# Altium PCB slave.PcbDoc (part 8 of 8)
Units mm, origin at the board's own origin, x right, y up, seen from the top; angles counter-clockwise.
Board outline 160 x 100 mm, 6 copper layers (Top, FUSED_VBAT-, Signals1, Signals2, SUPPLY, Bottom), stack 1.67 mm thick; 597 components, 381 nets, 1695 pads, 3029 vias.
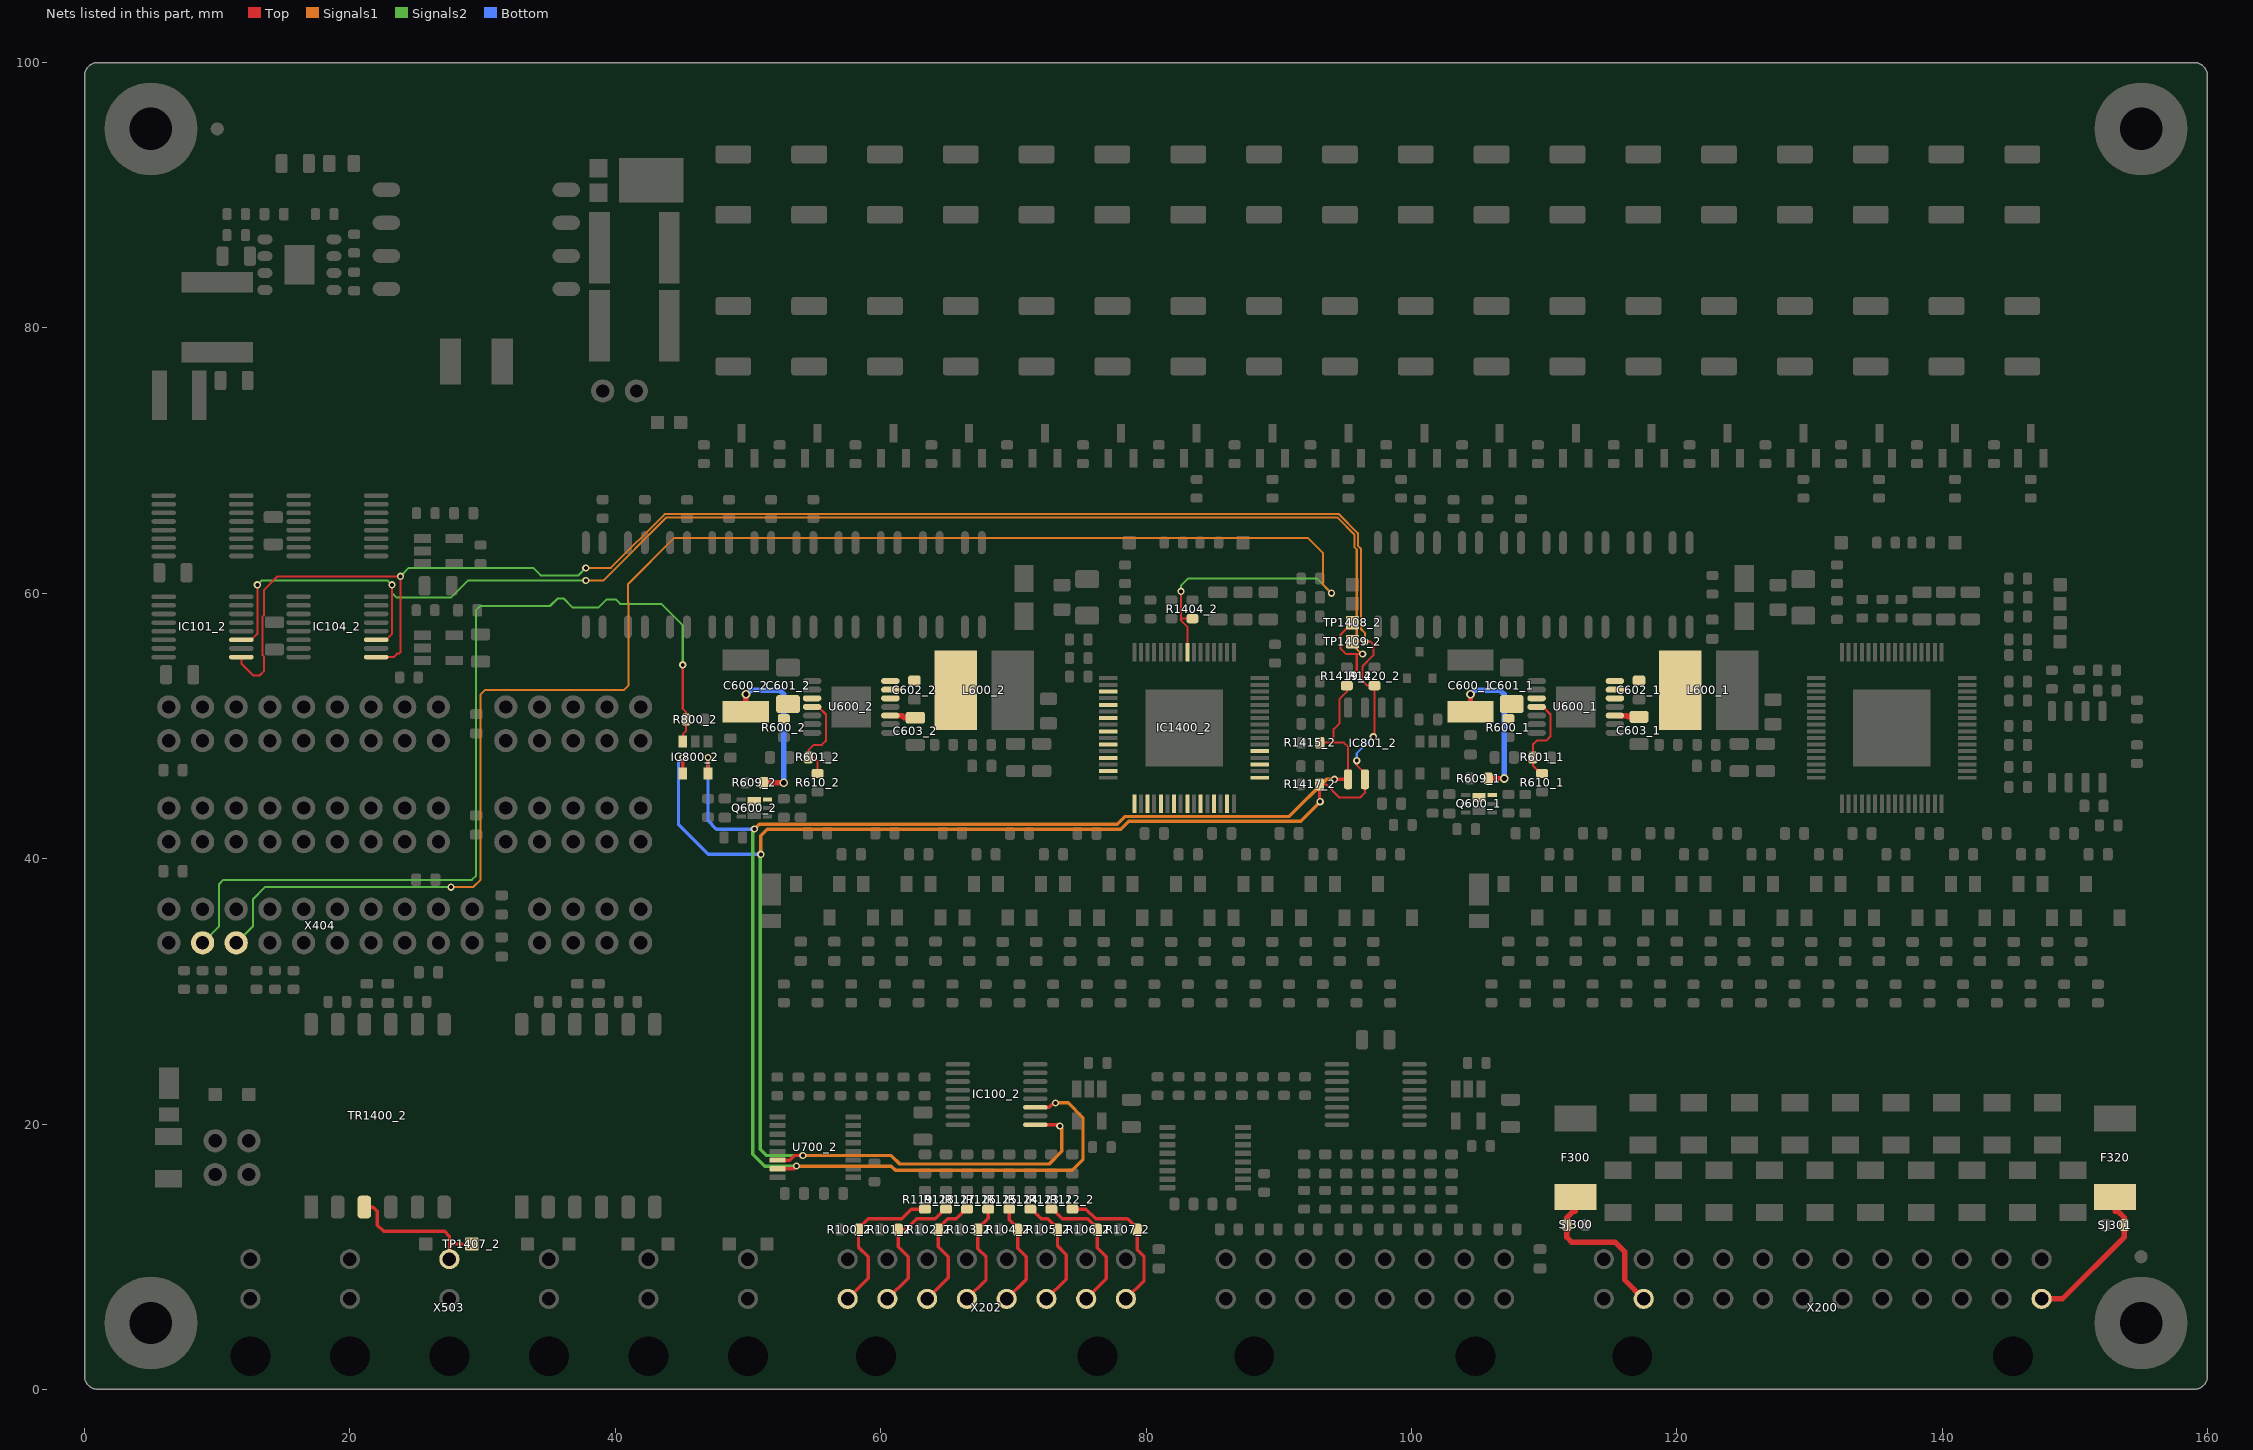
[diagram p11: the nets of this part, all layers, seen from the top]

## Via types
v1: diameter 0.55, hole 0.3, Top to Bottom, tented both sides, 2991 vias
v2: diameter 0.75, hole 0.5, Top to Bottom, tented both sides, 22 vias
v3: diameter 0.65, hole 0.4, Top to Bottom, tented both sides, 16 vias

## Nets (pads, with @x,y where several pads share a name; then routed paths per layer and width w, separated by ;. In a path a pad name is that pad's centre, name@x,y a point inside that pad or via, vN(x,y) a via of type N, cw(c..) or ccw(c..) an arc to the next point about the centre after c; other vN are vias at no path point) (continued)
SECONDARY-OUT-: TP1407_2.1 TR1400_2.3 X503.2 | length 11.4
  Top w0.254: TR1400_2.3@21.079,13.738 21.763,13.738 22.066,13.434 22.066,12.383 22.543,11.906 27.146,11.906 27.5,11.552 27.5,10.954 ; X503.2@27.5,9.815 27.5,10.954 ; TP1407_2.1@29.19,10.954 27.5,10.954
SECONDARY-S1: IC1400_2.37
SECONDARY-S2: IC1400_2.35
SECONDARY-S3: IC1400_2.33
SECONDARY-S4: IC1400_2.31
SECONDARY-S5: IC1400_2.29
SECONDARY-S6: IC1400_2.27
SECONDARY-S7: IC1400_2.25
SECONDARY-S8: IC1400_2.23
SECONDARY-S9: IC1400_2.21
SECONDARY-S10: IC1400_2.19
SECONDARY-S11: IC1400_2.17
SECONDARY-S12: IC1400_2.15
SECONDARY-S13: IC1400_2.13
SECONDARY-S14: IC1400_2.11
SECONDARY-S15: IC1400_2.9
SECONDARY-S16: IC1400_2.7
SECONDARY-S17: IC1400_2.5
SECONDARY-S18: IC1400_2.3
SECONDARY-SCL: IC100_2.1 IC101_2.1 IC104_2.1 IC800_2.4 IC801_2.6 R1417_2.1 R1420_2.1 TP1409_2.1 U700_2.14 | length 240.8
  Top w0.152: IC101_2.1@11.815,55.193 11.815,54.711 12.724,53.802 13.184,53.802 13.508,54.126 13.508,55.244 13.403,55.35 13.403,58.236 13.508,58.342 13.508,60.244 14.529,61.265 23.8,61.265 v1(23.812,61.277) 23.812,55.562 23.722,55.472 23.583,55.472 23.292,55.181 23.013,55.181 23.002,55.193 IC104_2.1@21.975,55.193 ; IC104_2.1@21.946,55.181 IC104_2.1@21.975,55.181 ; R1417_2.1@93.093,45.605 93.575,45.605 94.571,44.609 96.153,44.609 96.5,44.956 IC801_2.6@96.5,45.98 96.5,46.43 95.885,47.045 v1(95.885,47.38) ; R1417_2.1@93.129,45.548 R1417_2.1@93.143,45.561 ; TP1409_2.1@95.567,56.356 96.93,56.356 97.135,56.151 97.135,55.322 96.315,54.502 96.315,53.393 96.671,53.037 R1420_2.1@97.223,53.037 97.223,49.268 v1(97.135,49.18)
  Top w0.254: IC800_2.4@45.085,46.428 IC800_2.4@45.088,46.425 45.088,47.622 v1(45.085,47.625) ; U700_2.14@52.236,17.281 53.159,17.281 53.499,17.621 v1(54.134,17.621) ; IC100_2.1@71.664,19.95 73.395,19.95 v1(73.501,19.844) ; R1417_2.1@93.072,45.605 93.072,44.341 v1(93.122,44.291)
  Signals2 w0.152: v1(23.812,61.277) 24.447,61.912 33.823,61.912 34.378,61.358 37.228,61.358 v1(37.782,61.912)
  Signals2 w0.254: v1(50.97,40.322) 50.939,40.291 50.939,18.098 51.415,17.621 v1(54.134,17.621)
  Signals1 w0.152: v1(37.782,61.912) 39.671,61.912 43.718,65.959 94.545,65.959 95.966,64.539 95.966,63.588 96.203,63.351 96.203,57.309 96.5,57.011 v1(96.5,56.357)
  Signals1 w0.254: v1(50.97,40.322) 50.97,41.74 51.458,42.227 78.105,42.227 78.702,42.824 91.656,42.824 v1(93.122,44.291) ; v1(54.134,17.621) 60.801,17.621 61.436,16.986 72.707,16.986 73.66,17.939 73.66,19.685 v1(73.501,19.844)
  Bottom w0.152: v1(95.885,47.38) 95.885,47.942 97.122,49.18 v1(97.135,49.18)
  Bottom w0.254: v1(45.085,47.625) 44.767,47.307 44.767,42.545 46.99,40.322 v1(50.97,40.322)
SECONDARY-SDA: IC100_2.3 IC101_2.3 IC104_2.3 IC800_2.5 IC801_2.5 R1415_2.1 R1419_2.1 TP1408_2.1 U700_2.15 | length 238.5
  Top w0.152: IC101_2.3@11.786,56.502 IC101_2.3@11.815,56.502 ; IC101_2.3@11.815,56.493 12.565,56.493 13.018,56.945 v1(13.018,60.642) ; IC104_2.3@21.946,56.502 IC104_2.3@22.735,56.502 ; IC104_2.3@21.975,56.493 22.725,56.493 IC104_2.3@22.735,56.502 ; v1(23.177,60.642) 23.177,56.945 IC104_2.3@22.735,56.502 ; R1415_2.1@93.134,48.767 93.139,48.748 93.143,48.736 94.139,48.736 ; IC801_2.5@95.23,45.98 95.23,48.422 94.916,48.736 94.139,48.736 ; TP1408_2.1@95.567,57.785 94.675,56.892 94.675,55.82 95.068,55.427 95.885,55.427 ; v1(96.335,55.427) 95.885,55.427 ; 94.139,48.736 94.139,49.753 94.595,50.209 94.595,52.042 95.135,52.582 R1419_2.1@95.135,53.034 95.135,53.485 95.556,53.906 95.885,54.235 95.885,55.427
  Top w0.254: IC800_2.5@46.988,46.425 46.988,47.623 v1(46.99,47.625) ; U700_2.15@52.236,16.631 53.461,16.631 v1(53.657,16.828) ; IC100_2.3@71.664,21.25 72.69,21.25 73.03,21.59 v1(73.184,21.59) ; v1(94.212,45.98) IC801_2.5@95.23,45.98
  Signals2 w0.152: v1(13.018,60.642) 13.335,60.96 22.86,60.96 v1(23.177,60.642) 23.177,60.008 23.495,59.69 27.622,59.69 28.892,60.96 v1(37.782,60.96)
  Signals2 w0.254: v1(50.482,42.227) 50.365,42.11 50.365,17.719 51.256,16.828 v1(53.657,16.828)
  Signals1 w0.152: v1(37.782,60.96) 39.078,60.96 43.823,65.705 94.44,65.705 95.712,64.434 95.712,63.483 95.885,63.309 95.885,55.792 96.25,55.427 v1(96.335,55.427)
  Signals1 w0.254: v1(50.482,42.227) 50.838,42.583 51.458,42.583 77.826,42.583 78.422,43.18 90.805,43.18 93.605,45.98 v1(94.212,45.98) ; v1(53.657,16.828) 60.801,16.828 61.119,16.51 74.454,16.51 75.248,17.304 75.248,20.479 74.136,21.59 v1(73.184,21.59)
  Bottom w0.254: v1(46.99,47.625) 46.99,42.862 47.625,42.227 v1(50.482,42.227)
SECONDARY-T-SENSOR_0: R107_2.1 R112_2.2 X202.1 | length 11.6
  Top w0.254: R112_2.2@74.454,13.588 75.471,13.588 76.2,12.859 78.608,12.859 79.332,12.135 R107_2.1@79.332,12.035 79.332,10.521 79.851,10.001 79.851,8.179 X202.1@78.49,6.818
SECONDARY-T-SENSOR_1: R106_2.1 R113_2.2 X202.2 | length 10.3
  Top w0.254: R113_2.2@72.866,13.588 72.966,13.588 73.695,12.859 75.608,12.859 76.332,12.135 R106_2.1@76.332,12.035 76.332,10.663 76.994,10.001 76.994,8.319 X202.2@75.493,6.818
SECONDARY-T-SENSOR_2: R105_2.1 R114_2.2 X202.3 | length 8.9
  Top w0.254: R114_2.2@71.279,13.588 71.379,13.588 72.108,12.859 72.608,12.859 73.332,12.135 R105_2.1@73.332,12.035 73.332,10.806 73.977,10.16 73.977,8.299 X202.3@72.496,6.818
SECONDARY-T-SENSOR_3: R104_2.1 R115_2.2 X202.4 | length 7.9
  Top w0.254: X202.4@69.499,6.818 70.961,8.28 70.961,10.001 70.332,10.631 R104_2.1@70.332,12.035 70.332,12.135 69.691,12.775 R115_2.2@69.691,13.588
SECONDARY-T-SENSOR_4: R103_2.1 R116_2.2 X202.5 | length 7.9
  Top w0.254: X202.5@66.501,6.818 67.945,8.262 67.945,10.001 67.332,10.615 R103_2.1@67.332,12.035 67.332,12.135 68.104,12.907 R116_2.2@68.104,13.588
SECONDARY-T-SENSOR_5: R102_2.1 R117_2.2 X202.6 | length 9.1
  Top w0.254: X202.6@63.504,6.818 65.087,8.401 65.087,10.001 64.331,10.757 R102_2.1@64.331,12.035 64.331,12.135 65.055,12.859 65.687,12.859 66.416,13.588 R117_2.2@66.516,13.588
SECONDARY-T-SENSOR_6: R101_2.1 R118_2.2 X202.7 | length 10.4
  Top w0.254: X202.7@60.507,6.818 62.071,8.382 62.071,10.001 61.331,10.741 R101_2.1@61.331,12.035 61.883,12.035 62.706,12.859 64.1,12.859 64.829,13.588 R118_2.2@64.929,13.588
SECONDARY-T-SENSOR_7: R100_2.1 R119_2.2 X202.8 | length 11.9
  Top w0.254: X202.8@57.51,6.818 59.055,8.363 59.055,10.001 58.331,10.725 R100_2.1@58.331,12.035 58.331,12.135 59.055,12.859 61.595,12.859 62.324,13.588 R119_2.2@63.341,13.588
SECONDARY-TEMP-ALERT: IC800_2.3 R800_2.1 X404.18 | length 70.8
  Top w0.152: v1(45.085,54.61) 45.085,51.286 45.337,51.033 R800_2.1@45.337,50.482 45.337,49.627 45.088,49.377 IC800_2.3@45.088,48.825
  Signals2 w0.152: X404.18@8.89,33.655 10.14,34.905 10.14,38.088 10.457,38.405 29.19,38.405 29.507,38.723 29.507,58.725 29.825,59.043 35.081,59.043 35.648,59.609 36.107,59.609 36.771,58.945 38.752,58.945 39.353,59.546 40.022,59.546 40.369,59.199 43.476,59.199 45.085,57.59 v1(45.085,54.61)
SECONDARY-WDT: IC1400_2.56 R1404_2.1 X404.16 | length 130.3
  Top w0.152: v1(82.631,60.145) 82.631,58.102 ; IC1400_2.56@83.117,55.598 83.117,57.474 82.631,57.96 82.631,58.102 ; R1404_2.1@83.502,58.088 82.646,58.088 82.631,58.102
  Signals2 w0.152: X404.16@11.43,33.655 12.7,34.925 12.7,36.957 13.589,37.846 v1(27.618,37.846) ; v1(82.631,60.145) 82.631,60.565 83.185,61.119 92.869,61.119 v1(93.98,60.008)
  Signals1 w0.152: v1(27.618,37.846) 29.273,37.846 29.845,38.417 29.845,52.387 30.162,52.705 40.64,52.705 41.004,53.069 41.004,59.283 40.957,59.329 40.957,60.684 44.455,64.181 92.197,64.181 93.345,63.033 93.345,60.642 v1(93.98,60.008)
SHDN_1: R601_1.1 R610_1.1 U600_1.4 | length 7.1
  Top w0.152: U600_1.4@109.445,51.435 109.92,51.435 110.49,50.865 110.49,49.212 110.172,48.895 109.445,48.895 109.155,48.605 R601_1.1@109.155,47.625 109.155,47.02 109.755,46.42 R610_1.1@109.855,46.42
SHDN_2: R601_2.1 R610_2.1 U600_2.4 | length 7.2
  Top w0.152: U600_2.4@54.835,51.435 55.31,51.435 55.88,50.865 55.88,48.895 55.562,48.578 54.946,48.578 54.545,48.177 R601_2.1@54.545,47.625 54.997,47.625 55.245,47.377 R610_2.1@55.245,46.42
SW_1: C602_1.1 L600_1.1 U600_1.12 U600_1.13 U600_1.14
SW_2: C602_2.1 L600_2.1 U600_2.12 U600_2.13 U600_2.14
VBAT+: F300.1 SJ300.1 X200.11 | length 12.4
  Top w0.406: F300.1@112.375,14.5 112.375,13.418 112.187,13.418 111.715,12.947 SJ300.1@111.715,12.395 111.715,11.465 112.08,11.1 115.353,11.1 116.07,10.384 116.07,8.261 X200.11@117.513,6.818
VBAT-: F320.1 SJ301.2 X200.1 | length 11.6
  Top w0.406: X200.1@147.497,6.818 149.058,6.818 153.735,11.495 SJ301.2@153.735,12.383 153.735,12.934 153.238,13.431 153.035,13.431 F320.1@153.035,14.513
VCC_1: C603_1.2 U600_1.10 | length 1.9
  Top w0.406: U600_1.10@115.345,50.785 116.228,50.785 116.331,50.682 C603_1.2@117.157,50.682
VCC_2: C603_2.2 U600_2.10 | length 1.9
  Top w0.406: U600_2.10@60.735,50.785 61.618,50.785 61.784,50.619 C603_2.2@62.611,50.619
VIN_1: C600_1.2 C601_1.2 Q600_1.3 Q600_1.8 R600_1.2 R609_1.1 U600_1.3 | length 11.7
  Top w0.406: C600_1.2@104.457,51.073 v3(104.457,52.387) ; R609_1.1@105.793,46.038 v3(106.998,46.038)
  Bottom w0.406: v3(104.457,52.387) 104.775,52.705 106.68,52.705 106.998,52.387 v3(106.998,46.038)
VIN_2: C600_2.2 C601_2.2 Q600_2.3 Q600_2.8 R600_2.2 R609_2.1 U600_2.3 | length 12.6
  Top w0.406: C600_2.2@49.847,51.073 v3(49.847,52.387) ; R609_2.1@51.183,45.72 v3(52.705,45.72)
  Bottom w0.406: v3(49.847,52.387) 50.165,52.705 52.387,52.705 52.705,52.387 v3(52.705,45.72)
pads on no net: Designator5.Hole_3.2 Designator6.Hole_3.2 Designator7.Hole_3.2 Designator8.Hole_3.2 Designator11.0 Designator12.0 IC801_1.1 IC801_1.2 IC801_2.1 IC801_2.2 IC1400_1.53 IC1400_1.54 IC1400_2.53 IC1400_2.54 TR1400_1.2 TR1400_1.5 TR1400_2.2 TR1400_2.5 U700_1.13 U700_2.13 X200. X200.12 X200.23 X200.24 X201. X202. X500. X501. X502. X503. X1001. X1002.
copper on no net:
  other v1: 31.412,55.868

## Polygon pours and split planes (outlines as drawn)
+5.0V_VREG_1 on SUPPLY "Polygon_1_Net_+5.0V_VREG_1" (solid, remove dead copper, pour order 222): 5.08,32.067 17.145,32.067 52.07,32.067 52.07,13.97 55.88,13.97 55.88,0 79.375,0 79.375,31.75 100.647,31.75 100.647,63.817 48.895,63.817 48.895,34.608 5.08,34.608
+5.0V_VREG_0 on SUPPLY "Polygon_1_Net_+5.0V_VREG_0" (solid, remove dead copper, pour order 223): 17 vertices, not listed, extent 5.08,-0.185 160.384,69.27
+5.0V_VREG_1 on SUPPLY "SUPPLY-+5.0V_VREG_1" (solid, pour order 811): 5.08,59.69 32.703,59.69 32.703,53.34 44.767,53.34 44.767,45.72 5.08,45.72
NetC900_2 on Top "Polygon_1_Net_N$74" (solid, remove dead copper, pour order 779): 10.795,76.835 10.795,72.866 7.938,72.866 7.937,76.835
NetC902_2 on Top "Polygon_1_Net_N$1254" (solid, remove dead copper, pour order 761): 21 vertices, not listed, extent 4.763,72.866 23.812,93.345
EXT_DC_IN- on Top "Polygon_1_Net_EXT_DC_IN-" (solid, remove dead copper, pour order 753): 14.922,83.502 14.922,89.218 17.399,89.218 17.399,79.692 28.575,79.692 28.575,75.248 11.271,75.247 11.271,77.152 7.144,77.152 7.144,80.804 13.018,80.804 13.018,83.502
FUSED_VBAT- on Top "Polygon_2_Net_FUSED_VBAT-" (solid, pour order 759): 39.688,88.9 39.688,73.66 30.48,73.66 30.48,79.375 34.925,79.375 34.925,83.82 38.1,83.82 38.1,88.9
EXT_DC_ISO+ on Top "Polygon_1_Net_EXT_DC_ISO+" (solid, pour order 755): 45.402,93.662 45.402,73.66 40.957,73.66 40.957,89.535 40.322,89.535 40.322,93.662
+5.0V_VREG_1 on Top "Top-+5.0V_VREG_1" (solid, pour order 797): 67.945,55.88 67.945,46.355 68.897,46.355 68.897,49.53 70.802,49.53 70.802,51.435 73.66,51.435 73.66,55.88
EXT_DC_ISO+ on Top "Top-EXT_DC_ISO+ 1" (solid, pour order 821): 46.37,45.085 49.212,45.085 49.212,46.355 50.165,46.355 50.165,45.085 49.847,45.085 49.847,44.133 46.37,44.133
VIN_2 on Top "Top-VIN_2" (solid, pour order 823): 49.939,44.767 50.482,44.767 50.482,46.355 52.07,46.355 52.07,44.132 51.117,44.133 51.117,43.815 49.939,43.815
VIN_2 on Top "Top-EXT_DC_ISO+" (solid, pour order 789): 47.625,52.387 55.562,52.387 55.562,51.752 53.657,51.752 53.657,50.165 47.625,50.165
FUSED_VBAT- on Top "Top-FUSED_VBAT-" (solid, pour order 787): 18 vertices, not listed, extent 47.625,44.767 73.025,55.88
EXT_DC_ISO+ on Top "Top-EXT_DC_ISO+ 2" (solid, pour order 819): 100.98,45.402 103.822,45.402 103.822,46.672 104.775,46.672 104.775,45.402 104.457,45.402 104.457,44.45 100.98,44.45
VIN_1 on Top "Top-VIN_1" (solid, pour order 817): 104.549,45.085 105.093,45.085 105.093,46.672 106.68,46.672 106.68,44.45 105.727,44.45 105.727,44.133 104.549,44.133
VIN_1 on Top "Top-EXT_DC_ISO+" (solid, pour order 799): 102.235,52.388 110.172,52.387 110.172,51.752 108.267,51.752 108.267,50.165 102.235,50.165 102.235,51.752
FUSED_VBAT- on Top "Top-FUSED_VBAT-" (solid, pour order 807): 18 vertices, not listed, extent 102.235,44.767 127.635,55.88
NetC605_1_2 on Top "Top-NetC1505_2_2" (solid, pour order 803): 124.46,49.212 125.73,49.212 125.73,50.8 128.27,50.8 128.27,48.26 124.46,48.26
+5.0V_VREG_0 on Top "Top-+5.0V_VREG_1" (solid, pour order 801): 122.555,55.88 122.555,46.355 123.507,46.355 123.507,49.53 125.412,49.53 125.412,51.435 128.27,51.435 128.27,55.88
SW_2 on Top "Top-SW_2" (solid, pour order 815): 60.008,53.975 63.817,53.975 63.817,55.88 66.675,55.88 66.675,49.53 63.817,49.53 63.817,52.705 61.595,52.705 61.595,51.752 60.008,51.752
SW_1 on Top "Top-SW_2" (solid, pour order 805): 114.617,53.975 118.427,53.975 118.427,55.88 121.285,55.88 121.285,49.53 118.427,49.53 118.427,52.705 116.205,52.705 116.205,51.752 114.617,51.752
CELL_FEEDBACK.CELL17_FEEDBACK+ on Top "Polygon_1_Net_CELL0_FEEDBACK+" (solid, pour order 417): 51.435,71.755 46.355,71.755 46.355,78.74 51.435,78.74
NetC605_2_2 on Top "Top-NetC1505_2_2" (solid, pour order 793): 69.85,49.212 71.12,49.212 71.12,50.8 73.66,50.8 73.66,48.26 69.85,48.26
NetIC900_5 on Top "Polygon_1_Net_N$80" (solid, remove dead copper, pour order 763): 26.352,81.597 26.352,93.345 19.685,93.345 19.685,91.44 24.447,91.44 24.447,86.36 21.59,86.36 21.59,83.502 18.098,83.502 18.097,81.597
NetD901_2 on Top "Polygon_1_Net_N$84" (solid, remove dead copper, pour order 757): 39.37,93.662 39.37,89.535 34.925,89.535 34.925,93.662
NetC905_1 on Top "Polygon_1_Net_N$92" (solid, remove dead copper, pour order 751): 16.192,93.345 16.192,91.44 19.05,91.44 19.05,93.345
NetTR900_6 on Top "Polygon_1_Net_N$74" (solid, remove dead copper, pour order 745): 37.465,88.9 37.465,84.455 34.925,84.455 34.925,88.9
CELL_FEEDBACK.CELL0_FEEDBACK+ on Top "Polygon_1_Net_FUSED_CELL_0-" (solid, pour order 193): 148.59,91.44 143.51,91.44 143.51,98.425 148.59,98.425
FUSED_CELL.CELL_12+ on Top "Polygon_1_Net_N$4" (solid, pour order 375): 74.295,90.17 74.295,80.01 69.215,80.01 69.215,90.17
CELL_FEEDBACK.CELL1_FEEDBACK+ on Top "Polygon_1_Net_CELL0_FEEDBACK+" (solid, pour order 385): 142.875,71.755 137.795,71.755 137.795,78.74 142.875,78.74
CELL_FEEDBACK.CELL0_FEEDBACK+ on Top "Polygon_1_Net_CELL0_FEEDBACK+" (solid, pour order 185): 148.59,71.755 143.51,71.755 143.51,78.74 148.59,78.74
CELL_FEEDBACK.CELL16_FEEDBACK+ on Top "Polygon_1_Net_CELL0_FEEDBACK+" (solid, pour order 415): 57.15,71.755 52.07,71.755 52.07,78.74 57.15,78.74
FUSED_CELL.CELL_0- on Top "Polygon_1_Net_N$4" (solid, pour order 214): 148.59,90.17 148.59,80.01 143.51,80.01 143.51,90.17
CELL_FEEDBACK.CELL13_FEEDBACK+ on Top "Polygon_1_Net_CELL0_FEEDBACK+" (solid, pour order 409): 74.295,71.755 69.215,71.755 69.215,78.74 74.295,78.74
CELL_FEEDBACK.CELL14_FEEDBACK+ on Top "Polygon_1_Net_CELL0_FEEDBACK+" (solid, pour order 411): 68.58,71.755 63.5,71.755 63.5,78.74 68.58,78.74
CELL_FEEDBACK.CELL12_FEEDBACK+ on Top "Polygon_1_Net_CELL0_FEEDBACK+" (solid, pour order 407): 80.01,71.755 74.93,71.755 74.93,78.74 80.01,78.74
CELL_FEEDBACK.CELL11_FEEDBACK+ on Top "Polygon_1_Net_CELL0_FEEDBACK+" (solid, pour order 405): 85.725,71.755 80.645,71.755 80.645,78.74 85.725,78.74
CELL_FEEDBACK.CELL9_FEEDBACK+ on Top "Polygon_1_Net_CELL0_FEEDBACK+" (solid, pour order 401): 97.155,71.755 92.075,71.755 92.075,78.74 97.155,78.74
CELL_FEEDBACK.CELL8_FEEDBACK+ on Top "Polygon_1_Net_CELL0_FEEDBACK+" (solid, pour order 399): 102.873,71.755 97.793,71.755 97.793,78.74 102.873,78.74
CELL_FEEDBACK.CELL7_FEEDBACK+ on Top "Polygon_1_Net_CELL0_FEEDBACK+" (solid, pour order 397): 108.585,71.755 103.505,71.755 103.505,78.74 108.585,78.74
CELL_FEEDBACK.CELL6_FEEDBACK+ on Top "Polygon_1_Net_CELL0_FEEDBACK+" (solid, pour order 395): 114.303,71.755 109.223,71.755 109.223,78.74 114.303,78.74
CELL_FEEDBACK.CELL5_FEEDBACK+ on Top "Polygon_1_Net_CELL0_FEEDBACK+" (solid, pour order 393): 120.015,71.755 114.935,71.755 114.935,78.74 120.015,78.74
CELL_FEEDBACK.CELL4_FEEDBACK+ on Top "Polygon_1_Net_CELL0_FEEDBACK+" (solid, pour order 391): 125.73,71.755 120.65,71.755 120.65,78.74 125.73,78.74
CELL_FEEDBACK.CELL3_FEEDBACK+ on Top "Polygon_1_Net_CELL0_FEEDBACK+" (solid, pour order 389): 131.445,71.755 126.365,71.755 126.365,78.74 131.445,78.74
CELL_FEEDBACK.CELL2_FEEDBACK+ on Top "Polygon_1_Net_CELL0_FEEDBACK+" (solid, pour order 387): 137.16,71.755 132.08,71.755 132.08,78.74 137.16,78.74
CELL_FEEDBACK.CELL15_FEEDBACK+ on Top "Polygon_1_Net_CELL0_FEEDBACK+" (solid, pour order 413): 62.865,71.755 57.785,71.755 57.785,78.74 62.865,78.74
CELL_FEEDBACK.CELL10_FEEDBACK+ on Top "Polygon_1_Net_CELL0_FEEDBACK+" (solid, pour order 403): 91.44,71.755 86.36,71.755 86.36,78.74 91.44,78.74
FUSED_CELL.CELL_16+ on Top "Polygon_1_Net_N$4" (solid, pour order 383): 51.435,90.17 51.435,80.01 46.355,80.01 46.355,90.17
FUSED_CELL.CELL_15+ on Top "Polygon_1_Net_N$4" (solid, pour order 381): 57.15,90.17 57.15,80.01 52.07,80.01 52.07,90.17
FUSED_CELL.CELL_14+ on Top "Polygon_1_Net_N$4" (solid, pour order 379): 62.865,90.17 62.865,80.01 57.785,80.01 57.785,90.17
FUSED_CELL.CELL_13+ on Top "Polygon_1_Net_N$4" (solid, pour order 377): 68.58,90.17 68.58,80.01 63.5,80.01 63.5,90.17
FUSED_CELL.CELL_11+ on Top "Polygon_1_Net_N$4" (solid, pour order 373): 80.01,90.17 80.01,80.01 74.93,80.01 74.93,90.17
FUSED_CELL.CELL_10+ on Top "Polygon_1_Net_N$4" (solid, pour order 371): 85.725,90.17 85.725,80.01 80.645,80.01 80.645,90.17
FUSED_CELL.CELL_9+ on Top "Polygon_1_Net_N$4" (solid, pour order 369): 91.44,90.17 91.44,80.01 86.36,80.01 86.36,90.17
FUSED_CELL.CELL_8+ on Top "Polygon_1_Net_N$4" (solid, pour order 367): 97.155,90.17 97.155,80.01 92.075,80.01 92.075,90.17
FUSED_CELL.CELL_7+ on Top "Polygon_1_Net_N$4" (solid, pour order 365): 102.87,90.17 102.87,80.01 97.79,80.01 97.79,90.17
FUSED_CELL.CELL_6+ on Top "Polygon_1_Net_N$4" (solid, pour order 363): 108.585,90.17 108.585,80.01 103.505,80.01 103.505,90.17
FUSED_CELL.CELL_5+ on Top "Polygon_1_Net_N$4" (solid, pour order 361): 114.303,90.17 114.303,80.01 109.223,80.01 109.223,90.17
FUSED_CELL.CELL_4+ on Top "Polygon_1_Net_N$4" (solid, pour order 359): 120.015,90.17 120.015,80.01 114.935,80.01 114.935,90.17
FUSED_CELL.CELL_3+ on Top "Polygon_1_Net_N$4" (solid, pour order 357): 125.73,90.17 125.73,80.01 120.65,80.01 120.65,90.17
FUSED_CELL.CELL_2+ on Top "Polygon_1_Net_N$4" (solid, pour order 355): 131.445,90.17 131.445,80.01 126.365,80.01 126.365,90.17
FUSED_CELL.CELL_1+ on Top "Polygon_1_Net_N$4" (solid, pour order 353): 137.16,90.17 137.16,80.01 132.08,80.01 132.08,90.17
FUSED_CELL.CELL_0+ on Top "Polygon_1_Net_N$4" (solid, pour order 351): 142.875,90.17 142.875,80.01 137.795,80.01 137.795,90.17
CELL_FEEDBACK.CELL17_FEEDBACK+ on Top "Polygon_1_Net_FUSED_CELL_0-" (solid, pour order 349): 51.435,91.44 46.355,91.44 46.355,98.425 51.435,98.425
CELL_FEEDBACK.CELL16_FEEDBACK+ on Top "Polygon_1_Net_FUSED_CELL_0-" (solid, pour order 347): 57.15,91.44 52.07,91.44 52.07,98.425 57.15,98.425
CELL_FEEDBACK.CELL15_FEEDBACK+ on Top "Polygon_1_Net_FUSED_CELL_0-" (solid, pour order 345): 62.865,91.44 57.785,91.44 57.785,98.425 62.865,98.425
CELL_FEEDBACK.CELL14_FEEDBACK+ on Top "Polygon_1_Net_FUSED_CELL_0-" (solid, pour order 343): 68.58,91.44 63.5,91.44 63.5,98.425 68.58,98.425
CELL_FEEDBACK.CELL13_FEEDBACK+ on Top "Polygon_1_Net_FUSED_CELL_0-" (solid, pour order 341): 74.295,91.44 69.215,91.44 69.215,98.425 74.295,98.425
CELL_FEEDBACK.CELL12_FEEDBACK+ on Top "Polygon_1_Net_FUSED_CELL_0-" (solid, pour order 339): 80.01,91.44 74.93,91.44 74.93,98.425 80.01,98.425
CELL_FEEDBACK.CELL11_FEEDBACK+ on Top "Polygon_1_Net_FUSED_CELL_0-" (solid, pour order 337): 85.725,91.44 80.645,91.44 80.645,98.425 85.725,98.425
CELL_FEEDBACK.CELL10_FEEDBACK+ on Top "Polygon_1_Net_FUSED_CELL_0-" (solid, pour order 335): 91.44,91.44 86.36,91.44 86.36,98.425 91.44,98.425
CELL_FEEDBACK.CELL9_FEEDBACK+ on Top "Polygon_1_Net_FUSED_CELL_0-" (solid, pour order 333): 97.155,91.44 92.075,91.44 92.075,98.425 97.155,98.425
CELL_FEEDBACK.CELL8_FEEDBACK+ on Top "Polygon_1_Net_FUSED_CELL_0-" (solid, pour order 331): 102.87,91.44 97.79,91.44 97.79,98.425 102.87,98.425
CELL_FEEDBACK.CELL7_FEEDBACK+ on Top "Polygon_1_Net_FUSED_CELL_0-" (solid, pour order 329): 108.585,91.44 103.505,91.44 103.505,98.425 108.585,98.425
CELL_FEEDBACK.CELL6_FEEDBACK+ on Top "Polygon_1_Net_FUSED_CELL_0-" (solid, pour order 327): 114.3,91.44 109.22,91.44 109.22,98.425 114.3,98.425
CELL_FEEDBACK.CELL5_FEEDBACK+ on Top "Polygon_1_Net_FUSED_CELL_0-" (solid, pour order 325): 120.015,91.44 114.935,91.44 114.935,98.425 120.015,98.425
CELL_FEEDBACK.CELL4_FEEDBACK+ on Top "Polygon_1_Net_FUSED_CELL_0-" (solid, pour order 323): 125.73,91.44 120.65,91.44 120.65,98.425 125.73,98.425
CELL_FEEDBACK.CELL3_FEEDBACK+ on Top "Polygon_1_Net_FUSED_CELL_0-" (solid, pour order 321): 131.445,91.44 126.365,91.44 126.365,98.425 131.445,98.425
CELL_FEEDBACK.CELL2_FEEDBACK+ on Top "Polygon_1_Net_FUSED_CELL_0-" (solid, pour order 319): 137.16,91.44 132.08,91.44 132.08,98.425 137.16,98.425
CELL_FEEDBACK.CELL1_FEEDBACK+ on Top "Polygon_1_Net_FUSED_CELL_0-" (solid, pour order 317): 142.875,91.44 137.795,91.44 137.795,98.425 142.875,98.425
FUSED_VBAT- on Bottom "Polygon_2_Net_FUSED_VBAT-" (solid, remove dead copper, pour order 279): 75.248,42.227 75.248,57.468 90.487,57.468 90.487,42.227
FUSED_VBAT- on Bottom "Polygon_3_Net_FUSED_VBAT-" (solid, remove dead copper, pour order 278): 128.588,42.227 128.588,57.468 143.827,57.468 143.827,42.227
EXT_DC_IN- on Bottom "Polygon_2_Net_EXT_DC_IN-" (solid, pour order 773): 26.352,75.248 26.352,93.345 14.287,93.345 14.287,91.122 6.35,91.123 6.35,87.312 4.763,87.312 4.763,75.248
EXT_DC_ISO+ on Bottom "Polygon_6_Net_EXT_DC_ISO+" (solid, remove dead copper, pour order 771): 45.402,93.662 45.402,73.66 40.957,73.66 40.957,89.217 40.005,89.218 40.005,93.662
FUSED_VBAT- on Bottom "Polygon_3_Net_FUSED_VBAT-" (solid, pour order 769): 39.687,88.9 39.687,73.66 30.48,73.66 30.48,79.375 34.925,79.375 34.925,83.82 37.889,83.82 37.889,88.9
NetD901_2 on Bottom "Polygon_2_Net_N$84" (solid, pour order 767): 39.688,93.662 39.688,89.218 34.925,89.217 34.925,93.662
NetTR900_6 on Bottom "Polygon_2_Net_N$74" (solid, pour order 765): 37.465,88.9 37.465,84.455 34.925,84.455 34.925,88.9
CELL_FEEDBACK.CELL0_FEEDBACK+ on Bottom "Polygon_1_Net_FUSED_CELL_0-" (solid, pour order 739): 148.59,91.44 143.51,91.44 143.51,98.425 148.59,98.425
FUSED_CELL.CELL_12+ on Bottom "Polygon_1_Net_N$4" (solid, pour order 679): 74.295,90.17 74.295,80.01 69.215,80.01 69.215,90.17
FUSED_CELL.CELL_0- on Bottom "Polygon_1_Net_N$4" (solid, pour order 741): 148.59,90.17 148.59,80.01 143.51,80.01 143.51,90.17
CELL_FEEDBACK.CELL0_FEEDBACK+ on Bottom "Polygon_1_Net_CELL0_FEEDBACK+" (solid, pour order 743): 148.59,71.755 143.51,71.755 143.51,78.74 148.59,78.74
CELL_FEEDBACK.CELL1_FEEDBACK+ on Bottom "Polygon_1_Net_FUSED_CELL_0-" (solid, pour order 737): 142.875,91.44 137.795,91.44 137.795,98.425 142.875,98.425
CELL_FEEDBACK.CELL2_FEEDBACK+ on Bottom "Polygon_1_Net_FUSED_CELL_0-" (solid, pour order 735): 137.16,91.44 132.08,91.44 132.08,98.425 137.16,98.425
CELL_FEEDBACK.CELL3_FEEDBACK+ on Bottom "Polygon_1_Net_FUSED_CELL_0-" (solid, pour order 733): 131.445,91.44 126.365,91.44 126.365,98.425 131.445,98.425
CELL_FEEDBACK.CELL4_FEEDBACK+ on Bottom "Polygon_1_Net_FUSED_CELL_0-" (solid, pour order 731): 125.73,91.44 120.65,91.44 120.65,98.425 125.73,98.425
CELL_FEEDBACK.CELL5_FEEDBACK+ on Bottom "Polygon_1_Net_FUSED_CELL_0-" (solid, pour order 729): 120.015,91.44 114.935,91.44 114.935,98.425 120.015,98.425
CELL_FEEDBACK.CELL6_FEEDBACK+ on Bottom "Polygon_1_Net_FUSED_CELL_0-" (solid, pour order 727): 114.3,91.44 109.22,91.44 109.22,98.425 114.3,98.425
CELL_FEEDBACK.CELL7_FEEDBACK+ on Bottom "Polygon_1_Net_FUSED_CELL_0-" (solid, pour order 725): 108.585,91.44 103.505,91.44 103.505,98.425 108.585,98.425
CELL_FEEDBACK.CELL8_FEEDBACK+ on Bottom "Polygon_1_Net_FUSED_CELL_0-" (solid, pour order 723): 102.87,91.44 97.79,91.44 97.79,98.425 102.87,98.425
CELL_FEEDBACK.CELL9_FEEDBACK+ on Bottom "Polygon_1_Net_FUSED_CELL_0-" (solid, pour order 721): 97.155,91.44 92.075,91.44 92.075,98.425 97.155,98.425
CELL_FEEDBACK.CELL10_FEEDBACK+ on Bottom "Polygon_1_Net_FUSED_CELL_0-" (solid, pour order 719): 91.44,91.44 86.36,91.44 86.36,98.425 91.44,98.425
CELL_FEEDBACK.CELL11_FEEDBACK+ on Bottom "Polygon_1_Net_FUSED_CELL_0-" (solid, pour order 717): 85.725,91.44 80.645,91.44 80.645,98.425 85.725,98.425
CELL_FEEDBACK.CELL12_FEEDBACK+ on Bottom "Polygon_1_Net_FUSED_CELL_0-" (solid, pour order 715): 80.01,91.44 74.93,91.44 74.93,98.425 80.01,98.425
CELL_FEEDBACK.CELL13_FEEDBACK+ on Bottom "Polygon_1_Net_FUSED_CELL_0-" (solid, pour order 713): 74.295,91.44 69.215,91.44 69.215,98.425 74.295,98.425
CELL_FEEDBACK.CELL14_FEEDBACK+ on Bottom "Polygon_1_Net_FUSED_CELL_0-" (solid, pour order 711): 68.58,91.44 63.5,91.44 63.5,98.425 68.58,98.425
CELL_FEEDBACK.CELL15_FEEDBACK+ on Bottom "Polygon_1_Net_FUSED_CELL_0-" (solid, pour order 709): 62.865,91.44 57.785,91.44 57.785,98.425 62.865,98.425
CELL_FEEDBACK.CELL16_FEEDBACK+ on Bottom "Polygon_1_Net_FUSED_CELL_0-" (solid, pour order 707): 57.15,91.44 52.07,91.44 52.07,98.425 57.15,98.425
CELL_FEEDBACK.CELL17_FEEDBACK+ on Bottom "Polygon_1_Net_FUSED_CELL_0-" (solid, pour order 705): 51.435,91.44 46.355,91.44 46.355,98.425 51.435,98.425
FUSED_CELL.CELL_0+ on Bottom "Polygon_1_Net_N$4" (solid, pour order 703): 142.875,90.17 142.875,80.01 137.795,80.01 137.795,90.17
FUSED_CELL.CELL_1+ on Bottom "Polygon_1_Net_N$4" (solid, pour order 701): 137.16,90.17 137.16,80.01 132.08,80.01 132.08,90.17
FUSED_CELL.CELL_2+ on Bottom "Polygon_1_Net_N$4" (solid, pour order 699): 131.445,90.17 131.445,80.01 126.365,80.01 126.365,90.17
FUSED_CELL.CELL_3+ on Bottom "Polygon_1_Net_N$4" (solid, pour order 697): 125.73,90.17 125.73,80.01 120.65,80.01 120.65,90.17
FUSED_CELL.CELL_4+ on Bottom "Polygon_1_Net_N$4" (solid, pour order 695): 120.015,90.17 120.015,80.01 114.935,80.01 114.935,90.17
FUSED_CELL.CELL_5+ on Bottom "Polygon_1_Net_N$4" (solid, pour order 693): 114.303,90.17 114.303,80.01 109.223,80.01 109.223,90.17
FUSED_CELL.CELL_6+ on Bottom "Polygon_1_Net_N$4" (solid, pour order 691): 108.585,90.17 108.585,80.01 103.505,80.01 103.505,90.17
FUSED_CELL.CELL_7+ on Bottom "Polygon_1_Net_N$4" (solid, pour order 689): 102.87,90.17 102.87,80.01 97.79,80.01 97.79,90.17
FUSED_CELL.CELL_8+ on Bottom "Polygon_1_Net_N$4" (solid, pour order 687): 97.155,90.17 97.155,80.01 92.075,80.01 92.075,90.17
FUSED_CELL.CELL_9+ on Bottom "Polygon_1_Net_N$4" (solid, pour order 685): 91.44,90.17 91.44,80.01 86.36,80.01 86.36,90.17
FUSED_CELL.CELL_10+ on Bottom "Polygon_1_Net_N$4" (solid, pour order 683): 85.725,90.17 85.725,80.01 80.645,80.01 80.645,90.17
FUSED_CELL.CELL_11+ on Bottom "Polygon_1_Net_N$4" (solid, pour order 681): 80.01,90.17 80.01,80.01 74.93,80.01 74.93,90.17
FUSED_CELL.CELL_13+ on Bottom "Polygon_1_Net_N$4" (solid, pour order 677): 68.58,90.17 68.58,80.01 63.5,80.01 63.5,90.17
FUSED_CELL.CELL_14+ on Bottom "Polygon_1_Net_N$4" (solid, pour order 675): 62.865,90.17 62.865,80.01 57.785,80.01 57.785,90.17
FUSED_CELL.CELL_15+ on Bottom "Polygon_1_Net_N$4" (solid, pour order 673): 57.15,90.17 57.15,80.01 52.07,80.01 52.07,90.17
FUSED_CELL.CELL_16+ on Bottom "Polygon_1_Net_N$4" (solid, pour order 671): 51.435,90.17 51.435,80.01 46.355,80.01 46.355,90.17
CELL_FEEDBACK.CELL10_FEEDBACK+ on Bottom "Polygon_1_Net_CELL0_FEEDBACK+" (solid, pour order 669): 91.44,71.755 86.36,71.755 86.36,78.74 91.44,78.74
CELL_FEEDBACK.CELL15_FEEDBACK+ on Bottom "Polygon_1_Net_CELL0_FEEDBACK+" (solid, pour order 667): 62.865,71.755 57.785,71.755 57.785,78.74 62.865,78.74
CELL_FEEDBACK.CELL1_FEEDBACK+ on Bottom "Polygon_1_Net_CELL0_FEEDBACK+" (solid, pour order 665): 142.875,71.755 137.795,71.755 137.795,78.74 142.875,78.74
CELL_FEEDBACK.CELL2_FEEDBACK+ on Bottom "Polygon_1_Net_CELL0_FEEDBACK+" (solid, pour order 663): 137.16,71.755 132.08,71.755 132.08,78.74 137.16,78.74
CELL_FEEDBACK.CELL3_FEEDBACK+ on Bottom "Polygon_1_Net_CELL0_FEEDBACK+" (solid, pour order 661): 131.445,71.755 126.365,71.755 126.365,78.74 131.445,78.74
CELL_FEEDBACK.CELL4_FEEDBACK+ on Bottom "Polygon_1_Net_CELL0_FEEDBACK+" (solid, pour order 659): 125.73,71.755 120.65,71.755 120.65,78.74 125.73,78.74
CELL_FEEDBACK.CELL5_FEEDBACK+ on Bottom "Polygon_1_Net_CELL0_FEEDBACK+" (solid, pour order 657): 120.015,71.755 114.935,71.755 114.935,78.74 120.015,78.74
CELL_FEEDBACK.CELL6_FEEDBACK+ on Bottom "Polygon_1_Net_CELL0_FEEDBACK+" (solid, pour order 655): 114.303,71.755 109.223,71.755 109.223,78.74 114.303,78.74
CELL_FEEDBACK.CELL7_FEEDBACK+ on Bottom "Polygon_1_Net_CELL0_FEEDBACK+" (solid, pour order 653): 108.585,71.755 103.505,71.755 103.505,78.74 108.585,78.74
CELL_FEEDBACK.CELL8_FEEDBACK+ on Bottom "Polygon_1_Net_CELL0_FEEDBACK+" (solid, pour order 651): 102.873,71.755 97.793,71.755 97.793,78.74 102.873,78.74
CELL_FEEDBACK.CELL9_FEEDBACK+ on Bottom "Polygon_1_Net_CELL0_FEEDBACK+" (solid, pour order 649): 97.155,71.755 92.075,71.755 92.075,78.74 97.155,78.74
CELL_FEEDBACK.CELL11_FEEDBACK+ on Bottom "Polygon_1_Net_CELL0_FEEDBACK+" (solid, pour order 647): 85.725,71.755 80.645,71.755 80.645,78.74 85.725,78.74
CELL_FEEDBACK.CELL12_FEEDBACK+ on Bottom "Polygon_1_Net_CELL0_FEEDBACK+" (solid, pour order 645): 80.01,71.755 74.93,71.755 74.93,78.74 80.01,78.74
CELL_FEEDBACK.CELL14_FEEDBACK+ on Bottom "Polygon_1_Net_CELL0_FEEDBACK+" (solid, pour order 643): 68.58,71.755 63.5,71.755 63.5,78.74 68.58,78.74
CELL_FEEDBACK.CELL16_FEEDBACK+ on Bottom "Polygon_1_Net_CELL0_FEEDBACK+" (solid, pour order 641): 57.15,71.755 52.07,71.755 52.07,78.74 57.15,78.74
CELL_FEEDBACK.CELL17_FEEDBACK+ on Bottom "Polygon_1_Net_CELL0_FEEDBACK+" (solid, pour order 639): 51.435,71.755 46.355,71.755 46.355,78.74 51.435,78.74
CELL_FEEDBACK.CELL13_FEEDBACK+ on Bottom "Polygon_1_Net_CELL0_FEEDBACK+" (solid, pour order 637): 74.295,71.755 69.215,71.755 69.215,78.74 74.295,78.74
no net on Top Overlay "Polygon_1_NoNet" (solid): 159.385,58.737 152.4,58.738 152.4,76.835 159.385,76.835
no net on Top Overlay "Polygon_22_NoNet" (solid): 105 vertices, not listed, extent 24.396,67.723 41.54,73.259
no net on Top Overlay "Polygon_23_NoNet" (solid): 75 vertices, not listed, extent 37.74,69.218 39.488,71.772
no net on Top Overlay "Polygon_24_NoNet" (solid): 33 vertices, not listed, extent 35.016,69.224 37.236,71.765
no net on Top Overlay "Polygon_25_NoNet" (solid): 69 vertices, not listed, extent 32.721,69.239 34.501,71.751
no net on Top Overlay "Polygon_26_NoNet" (solid): 53 vertices, not listed, extent 29.647,69.215 31.877,71.438
no net on Top Overlay "Polygon_27_NoNet" (solid): 60 vertices, not listed, extent 27.634,69.211 29.655,71.438
no net on Top Overlay "Polygon_28_NoNet" (solid): 61 vertices, not listed, extent 25.661,68.439 27.89,72.257
no net on Top Overlay "Polygon_42_NoNet" (solid): 33 vertices, not listed, extent 1.338,53.42 1.87,53.948
no net on Top Overlay "Polygon_41_NoNet" (solid): 17 vertices, not listed, extent 1.941,53.184 3.698,54.184
no net on Top Overlay "Polygon_40_NoNet" (solid): 133 vertices, not listed, extent 0.698,51.865 4.337,55.503
no net on Top Overlay "Polygon_39_NoNet" (solid): 59 vertices, not listed, extent 1.945,49.506 3.092,50.55
no net on Top Overlay "Polygon_38_NoNet" (solid): 58 vertices, not listed, extent 1.945,48.461 3.092,49.505
no net on Top Overlay "Polygon_37_NoNet" (solid): 134 vertices, not listed, extent 0.7,47.684 4.337,51.322
no net on Bottom Overlay "Polygon_21_NoNet" (solid): 155.81,42.906 153.02,42.906 153.019,43.478 154.233,43.478 154.234,44.416 154.689,44.416 154.69,43.478 155.353,43.48 155.354,44.463 155.809,44.462
no net on Bottom Overlay "Polygon_20_NoNet" (solid): 23 vertices, not listed, extent 153.018,44.822 155.135,46.041
no net on Bottom Overlay "Polygon_19_NoNet" (solid): 32 vertices, not listed, extent 152.973,46.176 154.282,47.125
no net on Bottom Overlay "Polygon_18_NoNet" (solid): 49 vertices, not listed, extent 152.988,46.396 155.132,48.038
no net on Bottom Overlay "Polygon_17_NoNet" (solid): 41 vertices, not listed, extent 152.974,48.425 155.087,50.32
no net on Bottom Overlay "Polygon_16_NoNet" (solid): 44 vertices, not listed, extent 153.018,50.848 155.133,52.736
no net on Bottom Overlay "Polygon_15_NoNet" (solid): 43 vertices, not listed, extent 153.019,53.261 156.012,55.155
no net on Bottom Overlay "Polygon_14_NoNet" (solid): 75 vertices, not listed, extent 152.973,55.467 155.136,57.625
no net on Bottom Overlay "Polygon_13_NoNet" (solid): 35 vertices, not listed, extent 153.017,57.736 156.061,59.186
no net on Bottom Overlay "Polygon_12_NoNet" (solid): 68 vertices, not listed, extent 152.969,59.32 155.123,61.253
no net on Bottom Overlay "Polygon_11_NoNet" (solid): 25 vertices, not listed, extent 152.964,61.551 155.193,62.9
no net on Bottom Overlay "Polygon_10_NoNet" (solid): 151.63,59.51 151.63,59.805 150.225,59.804 150.226,59.51
no net on Bottom Overlay "Polygon_9_NoNet" (solid): 151.63,60.143 151.63,60.427 150.225,60.427 150.227,60.144
no net on Bottom Overlay "Polygon_8_NoNet" (solid): 60 vertices, not listed, extent 150.202,60.717 151.653,61.604
no net on Bottom Overlay "Polygon_7_NoNet" (solid): 56 vertices, not listed, extent 150.225,61.871 151.634,62.839
no net on Bottom Overlay "Polygon_6_NoNet" (solid): 157.189,37.396 156.021,37.403 156.041,37.776 156.096,38.328 156.197,39.032 156.271,39.425 156.365,39.842 156.517,40.407 156.675,40.894 156.85,41.35 156.933,41.542 157.192,41.542
no net on Bottom Overlay "Polygon_5_NoNet" (solid): 35 vertices, not listed, extent 155.325,37.398 156.849,41.54
no net on Bottom Overlay "Polygon_4_NoNet" (solid): 35 vertices, not listed, extent 154.222,37.401 156.467,41.539
no net on Bottom Overlay "Polygon_3_NoNet" (solid): 31 vertices, not listed, extent 153.021,37.401 155.96,41.54
no net on Bottom Overlay "Polygon_2_NoNet" (solid): 50 vertices, not listed, extent 153.019,37.771 155.468,41.541
no net on Bottom Overlay "Polygon_1_NoNet" (solid): 24 vertices, not listed, extent 153.02,38.864 155.058,41.54
FUSED_VBAT- on FUSED_VBAT- "FUSED_VBAT--No Net" (solid, pour order 809): 160.02,0 160.02,100 34.925,100 34.925,69.215 5.08,69.215 5.08,32.067 17.145,32.067 17.145,25.717 52.07,25.717 52.07,13.97 55.88,13.97 55.88,0

## Keep-outs
Keep-Out Layer:
  region: 4.5,91 4.5,9 0,9 0,91
  region: 155,100 155,99 5,99 5,100
  region: 160,91 160,11.112 155.5,11.112 155.5,91
  lines w0.152: 0,1 ccw(c1,1) 1,0 159,0 ccw(c159,1) 160,1 160,99 ccw(c159,99) 159,100 1,100 ccw(c1,99) 0,99 0,1

## Silkscreen, mask and mechanical layers (free items; w line width, h text height)
Top Overlay:
  drawing of 80 lines, arcs and shapes, not listed
  text "galvanic    isolation" at 25.4,96.837 h1.02
  text "↯" at 34.608,94.615 h30.48
  text "isolating / DC/DC Converter" at 13.97,94.297 h1.52
  text "DANGER / high voltage / >60VDC" at 37.782,94.297 h1.52
  text "Passive Cell / Balancing" at 152.718,80.962 h1.52 r90
  text "foxBMS.org" at 3.492,73.977 h3.05 r90
  text "Analog / Multiplexers" at 12.065,69.85 h1.52
  text "FUSED_VBAT-" at 75.565,64.611 h1.02
  text "+5.0V_VREG_1" at 83.82,64.611 h1.02
  text "FUSED_VBAT-" at 129.54,64.611 h1.02
  text "+5.0V_VREG_0" at 137.636,64.611 h1.02
  text "Primary" at 133.826,61.436 h1.52
  text "Secondary" at 81.28,61.404 h1.52
  text "Fraunhofer IISB / foxBMS Slave 18-Cell V'.GlobalVersion'" at 152.082,58.737 h1.52 r90
  text "Creative Commons / Attribution 4.0" at 3.492,56.197 h1.27 r90
  text "+3.0V_VREF_2_0 / +3.0V_VREF_1_0 / SDA_0 /           SCL_0" at 151.13,54.673 h1.02
  text "DC/DC Converter" at 57.309,43.466 h1.52
  text "DC/DC Converter" at 112.331,43.307 h1.52
  text "Extension / Pin Headers" at 3.81,38.417 h1.52 r90
  text "Input Filter/Protection" at 157.321,29.654 h1.52 r90
  text "isoSPI / Transformers" at 2.921,26.543 h1.52
  text "↯" at 152.876,25.876 h30.48
  text "galvanic / isolation" at 9.842,23.812 h1.02
  text "C_17+" at 115.57,23.812 h1.02 r90
  text "C_16+" at 117.475,23.812 h1.02 r90
  text "C_15+" at 119.38,23.812 h1.02 r90
  text "C_14+" at 121.285,23.812 h1.02 r90
  text "C_13+" at 123.19,23.812 h1.02 r90
  text "C_12+" at 125.095,23.812 h1.02 r90
  text "C_11+" at 127,23.812 h1.02 r90
  text "C_10+" at 128.905,23.812 h1.02 r90
  text "C_9+" at 130.81,23.812 h1.02 r90
  text "C_8+" at 132.715,23.812 h1.02 r90
  text "C_7+" at 134.62,23.812 h1.02 r90
  text "C_6+" at 136.525,23.812 h1.02 r90
  text "C_5+" at 138.43,23.812 h1.02 r90
  text "C_4+" at 140.335,23.812 h1.02 r90
  text "C_3+" at 142.24,23.812 h1.02 r90
  text "C_2+" at 144.145,23.812 h1.02 r90
  text "C_1+" at 146.05,23.812 h1.02 r90
  text "C_0+" at 147.955,23.812 h1.02 r90
  text "C_0-" at 149.86,23.812 h1.02 r90
  text "DANGER / high voltage" at 151.289,22.701 h1.52
  text "DC-" at 2.54,19.05 h1.02 r90
  text "DC-" at 4.127,19.05 h1.02 r90
  text "IN-" at 49.53,19.05 h1.02 r90
  text "OUT-" at 47.942,18.732 h1.02 r90
  text "Fuses / 0.25 A" at 116.046,18.574 h1.02 r90
  text "Fuses / 0.5 A" at 110.172,16.192 h1.02 r90
  text "DC+" at 2.54,15.875 h1.02 r90
  text "DC+" at 4.127,15.875 h1.02 r90
  text "IN+" at 49.53,15.875 h1.02 r90
  text "OUT+" at 47.942,15.24 h1.02 r90
  text "Input Fuses" at 157.321,13.621 h1.52 r90
  text "Fuse / 1.25 A" at 5.08,13.335 h1.02
Bottom Overlay:
  lines w0.203: 0.953,37.782 0.953,46.672 4.445,46.672 4.445,37.782 0.953,37.782 ; 13.97,12.383 16.51,12.383 16.51,23.812 13.97,23.812 13.97,12.383 ; 18.732,12.383 18.732,22.225 21.273,22.225 21.273,12.383 18.732,12.383 ; 26.035,12.383 26.035,28.258 28.575,28.258 28.575,12.383 26.035,12.383 ; 33.655,12.383 33.655,26.987 36.195,26.987 36.195,12.383 33.655,12.383 ; 41.275,12.383 41.275,26.352 43.815,26.352 43.815,12.383 41.275,12.383 ; 48.578,12.383 48.578,24.765 51.117,24.765 51.117,12.383 48.578,12.383 ; 60.325,12.383 75.565,12.383 75.565,16.51 60.325,16.51 60.325,12.383 ; 88.9,12.383 104.14,12.383 104.14,16.51 88.9,16.51 88.9,12.383 ; 126.682,12.383 126.682,16.51 134.938,16.51 134.938,12.383 126.682,12.383
  text "Extension / Pin Headers" at 1.587,38.405 h1.52 r270
  text "Temperature Sensors / Secondary" at 74.93,13.047 h1.52
  text "Temperature Sensors / Primary" at 103.505,13.047 h1.52
  text "DC Supply OUT" at 14.922,13.018 h1.52 r270
  text "DC Supply IN" at 19.685,13.018 h1.52 r270
  text "isoSPI OUT Secondary" at 26.987,13.018 h1.52 r270
  text "isoSPI IN Secondary" at 34.608,13.018 h1.52 r270
  text "isoSPI OUT Primary" at 42.227,13.018 h1.52 r270
  text "isoSPI IN Primary" at 49.53,13.018 h1.52 r270
  text "Cell Sense / Inputs" at 134.302,13.018 h1.52
Dimension:
  the board outline again, w0.152